# Altium PCB PCB4270Y_A00.PcbDoc (part 3 of 4)
Units mil, origin at the board's own origin, x right, y up, seen from the top; angles counter-clockwise.
Board outline 3622.05 x 2007.87 mil, 4 copper layers (Top Layer, Signal Layer 2, Signal Layer 3, Bottom Layer), stack 62.992 mil thick; 126 components, 105 nets, 457 pads, 1130 vias.
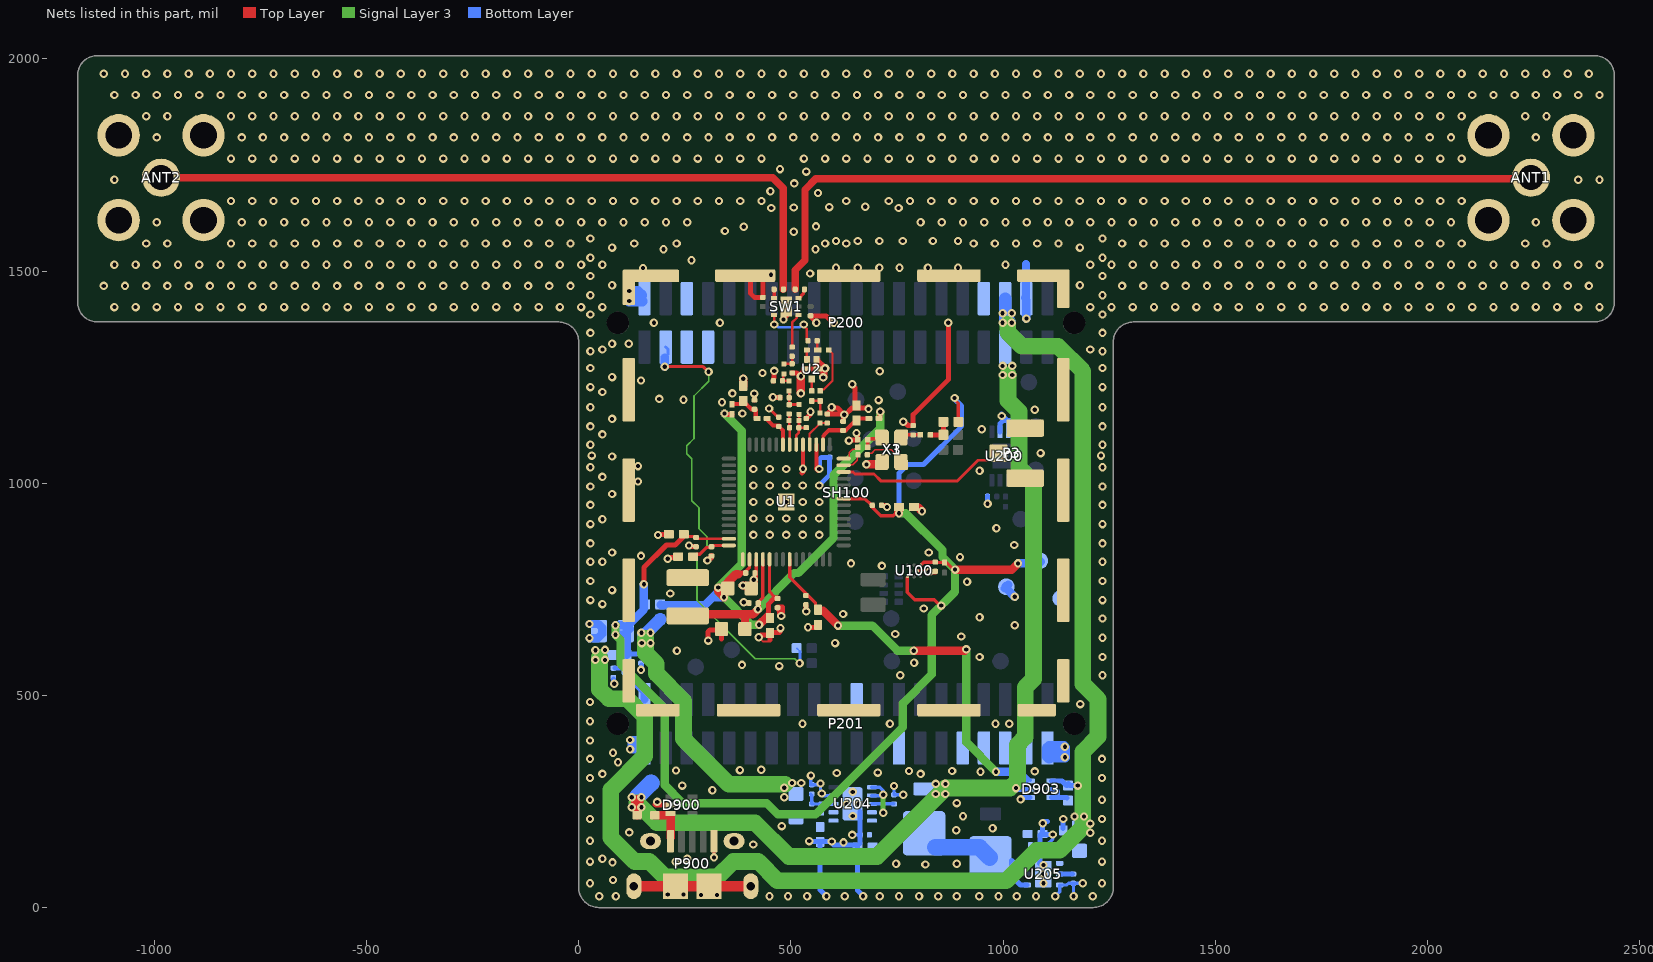
[diagram p5: the nets of this part, all layers, seen from the top]

## Via types
v1: diameter 19.68, hole 9.84, Top Layer to Bottom Layer, tented both sides, 1104 vias
v2: diameter 20, hole 9.84, Top Layer to Bottom Layer, tented both sides, 24 vias
v3: diameter 19.68/0/0/19.68 (per signal layer), hole 9.84, Top Layer to Bottom Layer, tented both sides, 2 vias

## Nets (pads, with @x,y where several pads share a name; then routed paths per layer and width w, separated by ;. In a path a pad name is that pad's centre, name@x,y a point inside that pad or via, vN(x,y) a via of type N, cw(c..) or ccw(c..) an arc to the next point about the centre after c; other vN are vias at no path point) (continued)
GND: ANT1.2 ANT1.3 ANT1.4 ANT1.5 ANT2.2 ANT2.3 ANT2.4 ANT2.5 C10.2 C11.2 C100.2 C102.2 C103.2 C105.2 C106.2 C107.2 C110.2 C111.2 C112.2 C113.2 C114.2 C115.2 C116.2 C117.2 C118.2 C119.2 C120.2 C121.2 C122.2 C123.2 C124.2 C200.2 C201.2 C203.2 C205.2 C207.2 C253.2 C254.2 C255.2 C257.2 C258.2 C259.2 C260.2 C261.2 CF1.2 CF2.2 CF3.2 CM1.2 CR1.2 D900.2 D903.1 P3.2 P3.3 P200.2 P200.38 P201.1 P201.39 P900.5 P900.6 P900.7 P900.8 P900.9 P900.10 P900.11 R6.1 R246.1 SH100.1 SW1.7 TPJ13.1 U1.0 U1.17 U1.19 U1.45 U2.2 U2.3 U2.5 U100.B2 U200.2 U200.3 U200.4 U204.4 U204.11 U205.3 U205.7 X1.2 X3.2 | length 4097.9
  Top Layer w3.94: v1(424.21,636.81) 434.06,626.97 450.79,626.97 ; X3.2@712.6,1044.29 X3.2@713.59,1043.3
  Top Layer w6.89: U100.B2@798.23,793.31 v1@818.9,793.31
  Top Layer w7.09: v1@453.06,1171.74 C107.2@469.57,1155.24
  Top Layer w7.87: v1(318.9,118.11) P900.5@318.9,156.5 ; C110.2@418.31,790.35 U1.45@418.31,820.47 ; C10.2@546.26,1394.69 546.46,1394.49 546.59,1394.35 546.59,1389.48 558.13,1377.95 v1(560.04,1377.95) ; v1@818.9,793.31 v1@819.88,792.32
  Top Layer w8.66: v1@527.97,1033.31 v1(528.54,1033.88)
  Top Layer w9.06: v1(528.54,1033.88) U1.19@528.54,1090.94 ; v1@560.04,1034.45 U1.17@560.04,1090.94
  Top Layer w11.81: v1@181.07,244.11 185.98,249.02 v1(185.04,249.02) ; v1@181.09,244.08 180.12,243.11 182.09,241.14 D900.2@216.54,241.14 ; v1@189.96,878.94 C117.2@213.58,878.94 ; v1@208.66,820.87 212.6,824.8 232.28,824.8 C123.2@234.25,826.77 ; v1@257.87,853.35 260.83,850.39 C116.2@276.57,850.39 ; v1(303.15,817.91) 310.04,824.8 C122.2@312.99,824.8 ; v1@304.13,627.95 304.13,649.61 309.02,654.49 334.61,654.49 C120.2@336.61,656.5 336.61,632.87 ; v1@304.13,816.93 305.12,816.93 C122.2@312.99,824.8 ; C122.2@312.99,829.72 C122.2@312.99,828.74 C122.2@312.99,824.8 ; v1@384.84,719.49 386.81,717.52 C121.2@398.62,717.52 ; SH100.1@392.32,1489.37 396.44,1489.37 405.3,1480.51 405.3,1446.64 413.95,1437.99 C11.2@434.06,1437.99 434.06,1480.51 444.75,1491.2 v1(452.79,1491.2) ; v1@410.45,772.66 411.08,772.66 410.43,773.31 v1@416.34,779.22 ; v1@411.42,1213.58 v1(413.78,1211.22) 414.37,1210.63 C106.2@414.37,1195.87 ; C111.2@412.4,750.98 416.34,754.92 v1@416.34,779.22 ; C110.2@416.34,789.37 v1@416.34,779.22 ; v1@430.12,642.72 444.88,642.72 C113.2@450.79,648.62 ; 450.79,630.91 C113.2@450.79,646.65 C113.2@450.79,648.62 ; v1(457.68,1202.76) 458.17,1202.26 474.21,1202.26 474.41,1202.07 CF1.2@474.41,1201.77 ; CF2.2@458.66,1241.14 458.86,1241.34 458.86,1246.66 460.63,1248.43 v1(460.63,1264.76) ; C112.2@468.12,705.32 473.43,700.01 ; C112.2@468.5,707.68 480.31,707.68 480.31,694.88 v1@477.36,691.93 ; v1@473.43,687.01 473.43,700.01 ; v1@474.41,658.46 474.41,649.61 473.43,648.62 C113.2@450.79,648.62 ; v1@474.41,688.98 v1@477.36,691.93 ; v1(477.36,687.01) v1@477.36,691.93 ; CF3.2@502.95,1259.84 503.15,1259.65 513.81,1259.65 521.49,1251.97 v1(523.62,1251.97) 525.13,1253.48 525.13,1258.99 530.41,1264.27 530.41,1268.7 U2.5@534.84,1268.7 U2.2@562.03,1268.7 ; v1@526.57,1024.61 528.54,1026.57 v1(528.54,1033.88) ; v1@535.43,697.83 C118.2@535.43,711.61 ; CM1.2@536.42,1152.56 546.26,1162.4 v1(546.26,1168.31) ; v1@542.32,660.43 558.07,660.43 C119.2@563.98,666.34 ; C10.2@546.46,1394.49 582.81,1394.49 599.28,1378.02 v1(601.41,1378.02) ; v1@560.04,1034.45 v1@563.98,1030.51 ; U2.3@560.55,1291.85 U2.3@561.06,1291.34 ; C103.2@623.03,1145.67 623.62,1145.67 623.82,1145.87 623.82,1157.12 625.98,1159.29 v1(625.98,1161.42) ; v1(636.81,1100.39) 638.94,1100.39 640.52,1101.97 657.09,1101.97 R6.1@657.48,1102.36 657.09,1102.36 656.69,1102.76 656.69,1113.81 654.53,1115.98 v1(654.53,1118.11) v1@652.4,1118.11 ; v1(644.68,1233.27) 644.68,1231.14 650.59,1225.23 650.59,1187.01 C102.2@654.53,1183.07 654.53,1181.1 650.59,1177.17 643.86,1177.17 628.11,1161.42 v1(625.98,1161.42) ; C102.2@652.56,1177.17 v1@679.13,1177.17 ; C114.2@713.58,947.83 724.41,947.83 v1@728.35,943.9 ; v1@725.49,943.9 v1(726.38,943.9) ; v2(764.76,1144.69) 766.98,1144.69 775.84,1135.83 787.93,1135.83 C100.2@788.12,1135.63 C100.2@788.19,1135.63 ; C100.2@788.71,1135.63 C100.2@788.19,1135.63 ; v1(825.79,791.34) 825.79,791.42 824.84,792.36 824.8,792.32 823.82,791.34 C124.2@840.55,791.34 ; v1(871.06,1377.95) 871.06,1244.09 788.39,1161.42 788.39,1135.83 C100.2@788.19,1135.63 ; 473.43,700.01 477.36,696.08 v1@477.36,691.93 ; U2.3@561.06,1291.34 562.03,1290.37 U2.2@562.03,1268.7 ; U2.3@561.06,1291.34 563.41,1291.34 563.41,1290.1 580.71,1272.8 v1(580.71,1270.67) 578.58,1270.67 576.61,1268.7 U2.2@563.58,1268.7 U2.2@562.03,1268.7 ; v1(625.98,1161.42) 609.82,1177.58 597.56,1177.58 v1(596.05,1179.09) 596.05,1173.81 CR1.2@585.63,1163.39 585.83,1163.19 622.08,1163.19 623.85,1161.42 v1(625.98,1161.42)
  Top Layer w12: v1(482.69,1385.67) 482.69,1387.75 489.17,1394.23 SW1.7@489.17,1416.34
  Top Layer w19.68: v1(386.81,758.86) 392.72,758.86 C111.2@397.64,753.94 ; C105.2@387.8,1228.35 v1(387.8,1246.06) ; v1(523.62,1211.61) v1(523.62,1251.97) ; v1(576.4,1249.38) 576.4,1266.36 v1(580.71,1270.67) ; v2(678.15,1044.29) X3.2@712.6,1044.29 ; C115.2@788.39,943.9 799.21,943.9 v1@808.07,935.04
  Top Layer w25: P900.8@129.92,50.2 P900.10@228.35,50.2 P900.11@307.09,50.2 P900.9@405.51,50.2
  Bottom Layer w7.87: v2@545.28,312.01 547.24,310.04 547.24,289.37 569.88,289.37 569.88,271.65 v1(572.83,268.7) ; v1@572.83,266.73 575.79,263.78 U204.4@600.39,263.78 ; v1@640.75,171.26 C254.2@663.39,171.26 ; v1@742.13,284.45 743.11,283.46 C255.2@743.11,265.75 762.8,265.75 v1@763.78,264.76 ; v1(1041.34,254.92) v1@1045.28,258.86 ; C261.2@1086.61,147.64 1087.6,147.64 1103.35,147.64 1117.13,161.42 v1@1117.13,169.29 ; v1(1123.03,26.57) 1133.46,37.01 U205.3@1133.46,53.15 1150.59,53.15 1154.53,57.09 C259.2@1165.94,57.09 ; v1@1165.35,29.53 1165.94,30.12 C259.2@1165.94,57.09 ; v1@1187.01,56.1 1186.02,57.09 C259.2@1165.94,57.09
  Bottom Layer w11.81: v1@81.69,533.46 C201.2@81.69,538.39 ; C203.2@147.64,571.85 147.64,561.02 v1(146.65,560.04) v1@148.62,558.07 ; v1@548.23,155.51 v1(596.46,155.51) ; v1@566.93,995.08 591.54,1019.69 C207.2@591.54,1061.02 571.85,1061.02 566.93,1056.1 v1@566.93,1034.45 ; C257.2@568.9,154.53 568.9,41.34 v1@582.68,27.56 ; v1@596.46,151.57 600.39,147.64 653.54,147.64 C253.2@657.48,143.7 657.48,40.35 v1@669.29,28.54 ; C253.2@663.39,150.59 C254.2@663.39,171.26 U204.11@663.39,226.38 ; v1(670.28,26.57) v1@670.28,27.56 ; v1(963.58,951.77) C200.2@963.58,969.49 ; U200.2@993.11,1121.06 993.11,1140.75 1000.49,1148.13 1025.1,1148.13 1032.48,1140.75 U200.4@1032.48,1121.06 ; v1@996.56,1162.89 996.56,1160.93 1012.8,1144.69 U200.3@1012.8,1121.06 ; v1@1045.28,258.86 D903.1@1063.98,258.86 ; U205.7@1085.63,103.35 1087.6,105.32 1087.6,147.64 1087.6,171.26 1088.58,172.24 1089.57,171.26 1090.55,172.24 v1(1117.13,172.24) ; C260.2@1093.5,177.17 1093.5,202.76 1104.33,202.76 ; C258.2@1141.73,186.02 v1(1141.73,208.66)
  Bottom Layer w19.68: v1(25.59,634.84) 45.28,634.84 55.12,644.69 55.12,659.45 46.26,668.31 v1(25.59,668.31) ; TPJ13.1@1003.94,751.97 TPJ13.1@1007.87,751.97 ; TPJ13.1@1005.91,756.89 1007.87,754.92 TPJ13.1@1007.87,751.97 ; v1(1027.56,732.28) TPJ13.1@1007.87,751.97 ; P200.38@1052.17,1437.01 1054.13,1438.98 1054.13,1516.73 ; P200.38@1054.13,1432.09 1055.12,1431.1 v1(1055.12,1387.8)
  Bottom Layer w20: TPJ13.1@1007.87,755.91 TPJ13.1@1012.8,760.83
  Bottom Layer w25: v1(119.09,1429.13) 149.47,1429.13 149.54,1429.2 P200.2@149.61,1429.13 ; v1@122.05,1452.76 139.17,1452.76 P200.2@149.02,1442.91 ; P201.39@1104.92,375.98 1138.78,375.98 v1@1142.72,379.92 ; P201.39@1104.92,375.98 1108.86,379.92 v1@1142.72,379.92 ; P201.39@1104.92,375.98 1104.92,355.71 1108.27,352.36 1110.24,354.33 1111.22,353.35 1112.2,354.33 v1(1145.67,354.33) 1145.67,376.97 v1@1142.72,379.92 ; v1@127.95,375 127.95,391.73 154.92,391.73 154.92,375 v1@127.95,375
  other v1: 48.23,26.57 87.6,26.57 449.8,26.57 493.11,26.57 538.39,26.57 583.66,26.57 626.97,26.57 709.65,26.57 754.92,26.57 802.17,26.57 847.44,26.57 890.75,26.57 943.9,26.57 989.17,26.57 1032.48,26.57 1077.76,26.57 1166.34,26.57 1211.61,26.57 288.39,29.53 325.79,29.53 209.65,30.51 247.05,30.51 26.57,57.09 1095.47,57.09 1187.99,57.09 1233.27,57.09 80.71,64.96 1095.47,78.74 1095.47,100.39 816.93,101.38 748.03,103.35 890.75,103.35 79.72,106.3 26.57,108.27 228.35,108.27 1233.27,108.27 55.71,114.96 255.71,114.96 411.42,148.62 624.02,153.54 543.31,156.5 26.57,157.48 1233.27,157.48 644.69,171.26 119.09,177.17 889.76,182.09 975.39,187.01 478.35,191.93 1093.5,198.82 26.57,208.66 1233.27,208.66 905.71,214.96 645.67,215.55 631.89,244.09 659.45,244.09 890.75,246.06 26.57,253.94 1233.27,253.94 764.76,265.75 645.67,272.64 314.96,276.57 743.11,286.42 244.09,287.4 569.88,292.32 26.57,305.12 1233.27,305.12 55.71,314.96 805.71,314.96 608.27,316.93 704.72,317.91 946.85,319.88 1074.8,320.87 778.54,321.85 879.92,321.85 229.33,322.83 379.92,323.82 430.12,324.8 92.52,342.52 26.57,350.39 1233.27,350.39 80.71,364.96 121.06,373.03 1145.67,378.94 26.57,393.7 121.06,394.69 527.56,433.07 733.27,433.07 982.28,433.07 1014.76,433.07 26.57,438.98 1182.09,479.33 26.57,484.25 83.66,527.56 757.87,547.24 1234.25,547.24 472.44,568.9 384.84,571.85 790.35,576.77 944.88,590.55 1234.25,590.55 231.31,605.34 604.33,623.03 305.12,628.94 1234.25,635.83 901.57,638.78 746.06,644.69 475.39,658.46 540.35,660.43 1027.59,665.41 1234.25,681.1 944.88,684.06 623.03,691.93 536.42,697.83 812.99,704.72 55.71,714.96 388.78,719.49 27.56,724.41 1234.25,724.41 215.55,740.16 78.74,748.03 915.35,767.72 27.56,769.69 1234.25,769.69 412.42,772.66 714.57,805.12 641.73,811.02 27.56,814.96 55.71,814.96 1234.25,814.96 209.66,821.89 898.62,825.79 146.65,828.74 78.74,836.61 824.8,836.61 259.84,853.35 1026.57,854.33 27.56,858.27 1234.25,858.27 187.01,877.95 411.57,878.11 450.37,878.11 489.17,878.11 527.97,878.11 566.77,878.11 984.29,893.76 27.56,903.54 1234.25,903.54 55.71,914.96 411.57,916.91 450.37,916.91 489.17,916.91 527.97,916.91 566.77,916.91 809.06,934.06 27.56,948.82 1234.25,948.82 411.57,955.71 450.37,955.71 489.17,955.71 527.97,955.71 566.77,955.71 78.74,974.41 27.56,992.13 1234.25,992.13 411.57,994.51 450.37,994.51 489.17,994.51 527.97,994.51 566.77,994.51 139.76,1003.94 55.71,1014.96 411.57,1033.31 450.37,1033.31 489.17,1033.31 566.77,1033.31 27.56,1037.4 1234.25,1037.4 139.76,1040.35 78.74,1062.99 30.71,1064.96 1230.71,1064.96 1088.58,1070.87 27.56,1090.55 1234.25,1090.55 55.71,1114.96 27.56,1133.86 1234.25,1133.86 78.74,1151.57 997.05,1158.46 385.83,1164.37 1074.8,1173.23 683.07,1175.2 448.82,1176.18 27.56,1179.13 1234.25,1179.13 337.6,1190.94 706.69,1195.87 247.05,1196.85 189.96,1198.82 362.2,1211.61 55.71,1214.96 27.56,1226.38 1234.25,1226.38 146.65,1242.13 78.74,1250 433.07,1259.84 709.65,1263.78 27.56,1271.65 1234.25,1271.65 27.56,1311.02 1234.25,1311.02 55.71,1314.96 1205.71,1314.96 78.78,1328.8 118.11,1328.74 27.56,1354.33 1234.25,1354.33 177.17,1377.95 332.68,1377.95 27.56,1397.64 1234.25,1397.64 -1094.29,1414.96 -1044.29,1414.96 -994.29,1414.96 -944.29,1414.96 -894.29,1414.96 -844.29,1414.96 -794.29,1414.96 -744.29,1414.96 -694.29,1414.96 -644.29,1414.96 -594.29,1414.96 -544.29,1414.96 -494.29,1414.96 -444.29,1414.96 -394.29,1414.96 -344.29,1414.96 -294.29,1414.96 -244.29,1414.96 -194.29,1414.96 -144.29,1414.96 -94.29,1414.96 -44.29,1414.96 5.71,1414.96 55.71,1414.96 1205.71,1414.96 1255.71,1414.96 1305.71,1414.96 1355.71,1414.96 1405.71,1414.96 1455.71,1414.96 1505.71,1414.96 1555.71,1414.96 1605.71,1414.96 1655.71,1414.96 1705.71,1414.96 1755.71,1414.96 1805.71,1414.96 1855.71,1414.96 1905.71,1414.96 1955.71,1414.96 2005.71,1414.96 2055.71,1414.96 2105.71,1414.96 2155.71,1414.96 2205.71,1414.96 2255.71,1414.96 2305.71,1414.96 2355.71,1414.96 2405.71,1414.96 27.56,1442.91 1234.25,1442.91 119.09,1452.76 -1119.29,1464.96 -1069.29,1464.96 -1019.29,1464.96 -969.29,1464.96 -919.29,1464.96 -869.29,1464.96 -819.29,1464.96 -769.29,1464.96 -719.29,1464.96 -669.29,1464.96 -619.29,1464.96 -569.29,1464.96 -519.29,1464.96 -469.29,1464.96 -419.29,1464.96 -369.29,1464.96 -319.29,1464.96 -269.29,1464.96 -219.29,1464.96 -169.29,1464.96 -119.29,1464.96 -69.29,1464.96 -19.29,1464.96 1280.71,1464.96 1330.71,1464.96 1380.71,1464.96 1430.71,1464.96 1480.71,1464.96 1530.71,1464.96 1580.71,1464.96 1630.71,1464.96 1680.71,1464.96 1730.71,1464.96 1780.71,1464.96 1830.71,1464.96 1880.71,1464.96 1930.71,1464.96 1980.71,1464.96 2030.71,1464.96 2080.71,1464.96 2130.71,1464.96 2180.71,1464.96 2230.71,1464.96 2280.71,1464.96 2330.71,1464.96 2380.71,1464.96 78.78,1466.6 1181.14,1466.6 27.56,1488.19 1234.25,1488.19 545.28,1494.09 151.57,1506.89 606.3,1507.87 657.48,1507.87 708.66,1507.87 755.91,1507.87 822.83,1507.87 893.7,1507.87 -1094.29,1514.96 -1044.29,1514.96 -994.29,1514.96 -944.29,1514.96 -894.29,1514.96 -844.29,1514.96 -794.29,1514.96 -744.29,1514.96 -694.29,1514.96 -644.29,1514.96 -594.29,1514.96 -544.29,1514.96 -494.29,1514.96 -444.29,1514.96 -394.29,1514.96 -344.29,1514.96 -294.29,1514.96 -244.29,1514.96 -194.29,1514.96 -144.29,1514.96 -94.29,1514.96 -44.29,1514.96 5.71,1514.96 55.71,1514.96 1005.71,1514.96 1205.71,1514.96 1255.71,1514.96 1305.71,1514.96 1355.71,1514.96 1405.71,1514.96 1455.71,1514.96 1505.71,1514.96 1555.71,1514.96 1605.71,1514.96 1655.71,1514.96 1705.71,1514.96 1755.71,1514.96 1805.71,1514.96 1855.71,1514.96 1905.71,1514.96 1955.71,1514.96 2005.71,1514.96 2055.71,1514.96 2105.71,1514.96 2155.71,1514.96 2205.71,1514.96 2255.71,1514.96 2305.71,1514.96 2355.71,1514.96 2405.71,1514.96 265.75,1525.59 27.56,1531.5 1234.25,1531.5 199.8,1551.18 558.07,1551.18 78.78,1555.18 1181.14,1555.18 -1019.29,1564.96 -969.29,1564.96 -819.29,1564.96 -769.29,1564.96 -719.29,1564.96 -669.29,1564.96 -619.29,1564.96 -569.29,1564.96 -519.29,1564.96 -469.29,1564.96 -419.29,1564.96 -369.29,1564.96 -319.29,1564.96 -269.29,1564.96 -219.29,1564.96 -169.29,1564.96 -119.29,1564.96 -69.29,1564.96 -19.29,1564.96 130.71,1564.96 230.71,1564.96 580.71,1564.96 630.71,1564.96 930.71,1564.96 980.71,1564.96 1030.71,1564.96 1080.71,1564.96 1130.71,1564.96 1280.71,1564.96 1330.71,1564.96 1380.71,1564.96 1430.71,1564.96 1480.71,1564.96 1530.71,1564.96 1580.71,1564.96 1630.71,1564.96 1680.71,1564.96 1730.71,1564.96 1780.71,1564.96 1830.71,1564.96 1880.71,1564.96 1930.71,1564.96 1980.71,1564.96 2030.71,1564.96 2080.71,1564.96 2230.71,1564.96 2280.71,1564.96 606.3,1570.87 657.48,1570.87 708.66,1570.87 763.78,1570.87 834.65,1570.87 893.7,1570.87 27.56,1576.77 1234.25,1576.77 506.89,1592.52 344.49,1594.49 388.78,1604.33 559.06,1605.32 -994.29,1614.96 -794.29,1614.96 -744.29,1614.96 -694.29,1614.96 -644.29,1614.96 -594.29,1614.96 -544.29,1614.96 -494.29,1614.96 -444.29,1614.96 -394.29,1614.96 -344.29,1614.96 -294.29,1614.96 -244.29,1614.96 -194.29,1614.96 -144.29,1614.96 -94.29,1614.96 -44.29,1614.96 5.71,1614.96 55.71,1614.96 105.71,1614.96 155.71,1614.96 205.71,1614.96 255.71,1614.96 805.71,1614.96 855.71,1614.96 905.71,1614.96 955.71,1614.96 1005.71,1614.96 1055.71,1614.96 1105.71,1614.96 1155.71,1614.96 1205.71,1614.96 1255.71,1614.96 1305.71,1614.96 1355.71,1614.96 1405.71,1614.96 1455.71,1614.96 1505.71,1614.96 1555.71,1614.96 1605.71,1614.96 1655.71,1614.96 1705.71,1614.96 1755.71,1614.96 1805.71,1614.96 1855.71,1614.96 1905.71,1614.96 1955.71,1614.96 2005.71,1614.96 2055.71,1614.96 2255.71,1614.96 453.74,1648.62 753.94,1648.62 506.89,1649.61 590.55,1650.59 675.2,1651.57 -819.29,1664.96 -769.29,1664.96 -719.29,1664.96 -669.29,1664.96 -619.29,1664.96 -569.29,1664.96 -519.29,1664.96 -469.29,1664.96 -419.29,1664.96 -369.29,1664.96 -319.29,1664.96 -269.29,1664.96 -219.29,1664.96 -169.29,1664.96 -119.29,1664.96 -69.29,1664.96 -19.29,1664.96 30.71,1664.96 80.71,1664.96 130.71,1664.96 180.71,1664.96 230.71,1664.96 280.71,1664.96 330.71,1664.96 380.71,1664.96 430.71,1664.96 630.71,1664.96 730.71,1664.96 780.71,1664.96 830.71,1664.96 880.71,1664.96 930.71,1664.96 980.71,1664.96 1030.71,1664.96 1080.71,1664.96 1130.71,1664.96 1180.71,1664.96 1230.71,1664.96 1280.71,1664.96 1330.71,1664.96 1380.71,1664.96 1430.71,1664.96 1480.71,1664.96 1530.71,1664.96 1580.71,1664.96 1630.71,1664.96 1680.71,1664.96 1730.71,1664.96 1780.71,1664.96 1830.71,1664.96 1880.71,1664.96 1930.71,1664.96 1980.71,1664.96 2030.71,1664.96 2080.71,1664.96 563.98,1684.06 451.77,1687.99 507.87,1706.69 -1094.29,1714.96 2355.71,1714.96 2405.71,1714.96 536.42,1734.25 474.41,1740.16 -819.29,1764.96 -769.29,1764.96 -719.29,1764.96 -669.29,1764.96 -619.29,1764.96 -569.29,1764.96 -519.29,1764.96 -469.29,1764.96 -419.29,1764.96 -369.29,1764.96 -319.29,1764.96 -269.29,1764.96 -219.29,1764.96 -169.29,1764.96 -119.29,1764.96 -69.29,1764.96 -19.29,1764.96 30.71,1764.96 80.71,1764.96 130.71,1764.96 180.71,1764.96 230.71,1764.96 280.71,1764.96 330.71,1764.96 380.71,1764.96 430.71,1764.96 530.71,1764.96 580.71,1764.96 630.71,1764.96 680.71,1764.96 730.71,1764.96 780.71,1764.96 830.71,1764.96 880.71,1764.96 930.71,1764.96 980.71,1764.96 1030.71,1764.96 1080.71,1764.96 1130.71,1764.96 1180.71,1764.96 1230.71,1764.96 1280.71,1764.96 1330.71,1764.96 1380.71,1764.96 1430.71,1764.96 1480.71,1764.96 1530.71,1764.96 1580.71,1764.96 1630.71,1764.96 1680.71,1764.96 1730.71,1764.96 1780.71,1764.96 1830.71,1764.96 1880.71,1764.96 1930.71,1764.96 1980.71,1764.96 2030.71,1764.96 2080.71,1764.96 -994.29,1814.96 -794.29,1814.96 -744.29,1814.96 -694.29,1814.96 -644.29,1814.96 -594.29,1814.96 -544.29,1814.96 -494.29,1814.96 -444.29,1814.96 -394.29,1814.96 -344.29,1814.96 -294.29,1814.96 -244.29,1814.96 -194.29,1814.96 -144.29,1814.96 -94.29,1814.96 -44.29,1814.96 5.71,1814.96 55.71,1814.96 105.71,1814.96 155.71,1814.96 205.71,1814.96 255.71,1814.96 305.71,1814.96 355.71,1814.96 405.71,1814.96 455.71,1814.96 505.71,1814.96 555.71,1814.96 605.71,1814.96 655.71,1814.96 705.71,1814.96 755.71,1814.96 805.71,1814.96 855.71,1814.96 905.71,1814.96 955.71,1814.96 1005.71,1814.96 1055.71,1814.96 1105.71,1814.96 1155.71,1814.96 1205.71,1814.96 1255.71,1814.96 1305.71,1814.96 1355.71,1814.96 1405.71,1814.96 1455.71,1814.96 1505.71,1814.96 1555.71,1814.96 1605.71,1814.96 1655.71,1814.96 1705.71,1814.96 1755.71,1814.96 1805.71,1814.96 1855.71,1814.96 1905.71,1814.96 1955.71,1814.96 2005.71,1814.96 2055.71,1814.96 2255.71,1814.96 -1019.29,1864.96 -969.29,1864.96 -819.29,1864.96 -769.29,1864.96 -719.29,1864.96 -669.29,1864.96 -619.29,1864.96 -569.29,1864.96 -519.29,1864.96 -469.29,1864.96 -419.29,1864.96 -369.29,1864.96 -319.29,1864.96 -269.29,1864.96 -219.29,1864.96 -169.29,1864.96 -119.29,1864.96 -69.29,1864.96 -19.29,1864.96 30.71,1864.96 80.71,1864.96 130.71,1864.96 180.71,1864.96 230.71,1864.96 280.71,1864.96 330.71,1864.96 380.71,1864.96 430.71,1864.96 480.71,1864.96 530.71,1864.96 580.71,1864.96 630.71,1864.96 680.71,1864.96 730.71,1864.96 780.71,1864.96 830.71,1864.96 880.71,1864.96 930.71,1864.96 980.71,1864.96 1030.71,1864.96 1080.71,1864.96 1130.71,1864.96 1180.71,1864.96 1230.71,1864.96 1280.71,1864.96 1330.71,1864.96 1380.71,1864.96 1430.71,1864.96 1480.71,1864.96 1530.71,1864.96 1580.71,1864.96 1630.71,1864.96 1680.71,1864.96 1730.71,1864.96 1780.71,1864.96 1830.71,1864.96 1880.71,1864.96 1930.71,1864.96 1980.71,1864.96 2030.71,1864.96 2080.71,1864.96 2230.71,1864.96 2280.71,1864.96 -1094.29,1914.96 -1044.29,1914.96 -994.29,1914.96 -944.29,1914.96 -894.29,1914.96 -844.29,1914.96 -794.29,1914.96 -744.29,1914.96 -694.29,1914.96 -644.29,1914.96 -594.29,1914.96 -544.29,1914.96 -494.29,1914.96 -444.29,1914.96 -394.29,1914.96 -344.29,1914.96 -294.29,1914.96 -244.29,1914.96 -194.29,1914.96 -144.29,1914.96 -94.29,1914.96 -44.29,1914.96 5.71,1914.96 55.71,1914.96 105.71,1914.96 155.71,1914.96 205.71,1914.96 255.71,1914.96 305.71,1914.96 355.71,1914.96 405.71,1914.96 455.71,1914.96 505.71,1914.96 555.71,1914.96 605.71,1914.96 655.71,1914.96 705.71,1914.96 755.71,1914.96 805.71,1914.96 855.71,1914.96 905.71,1914.96 955.71,1914.96 1005.71,1914.96 1055.71,1914.96 1105.71,1914.96 1155.71,1914.96 1205.71,1914.96 1255.71,1914.96 1305.71,1914.96 1355.71,1914.96 1405.71,1914.96 1455.71,1914.96 1505.71,1914.96 1555.71,1914.96 1605.71,1914.96 1655.71,1914.96 1705.71,1914.96 1755.71,1914.96 1805.71,1914.96 1855.71,1914.96 1905.71,1914.96 1955.71,1914.96 2005.71,1914.96 2055.71,1914.96 2105.71,1914.96 2155.71,1914.96 2205.71,1914.96 2255.71,1914.96 2305.71,1914.96 2355.71,1914.96 2405.71,1914.96 -1119.29,1964.96 -1069.29,1964.96 -1019.29,1964.96 -969.29,1964.96 -919.29,1964.96 -869.29,1964.96 -819.29,1964.96 -769.29,1964.96 -719.29,1964.96 -669.29,1964.96 -619.29,1964.96 -569.29,1964.96 -519.29,1964.96 -469.29,1964.96 -419.29,1964.96 -369.29,1964.96 -319.29,1964.96 -269.29,1964.96 -219.29,1964.96 -169.29,1964.96 -119.29,1964.96 -69.29,1964.96 -19.29,1964.96 30.71,1964.96 80.71,1964.96 130.71,1964.96 180.71,1964.96 230.71,1964.96 280.71,1964.96 330.71,1964.96 380.71,1964.96 430.71,1964.96 480.71,1964.96 530.71,1964.96 580.71,1964.96 630.71,1964.96 680.71,1964.96 730.71,1964.96 780.71,1964.96 830.71,1964.96 880.71,1964.96 930.71,1964.96 980.71,1964.96 1030.71,1964.96 1080.71,1964.96 1130.71,1964.96 1180.71,1964.96 1230.71,1964.96 1280.71,1964.96 1330.71,1964.96 1380.71,1964.96 1430.71,1964.96 1480.71,1964.96 1530.71,1964.96 1580.71,1964.96 1630.71,1964.96 1680.71,1964.96 1730.71,1964.96 1780.71,1964.96 1830.71,1964.96 1880.71,1964.96 1930.71,1964.96 1980.71,1964.96 2030.71,1964.96 2080.71,1964.96 2130.71,1964.96 2180.71,1964.96 2230.71,1964.96 2280.71,1964.96 2330.71,1964.96 2380.71,1964.96
  other v2: 547.24,311.02 944.88,1029.53 949.8,1126.97
JOYSTICK: P200.3 R217.2 | length 1104
  Top Layer w6.89: v1(202.76,1274.61) 293.31,1274.61 v1@306.1,1261.81
  Signal Layer 3 w3.94: v1(306.1,1262.8) 306.1,1240.16 271.65,1205.71 271.65,1105.32 254.94,1088.6 254.94,1069.32 266.73,1057.52 266.73,958.66 283.46,941.93 283.46,892.72 302.17,874.02 302.17,851.13 278.78,827.74 278.78,724.06 416.22,586.61 508.86,586.61 513.84,581.64 513.84,575.79 519.71,581.66 520.67,580.71 v1(520.67,575.79)
  Bottom Layer w3.94: R217.2@513.78,611.22 R217.2@521.65,603.35
  Bottom Layer w6.89: P200.3@202.77,1296.27 210.79,1304.29 210.79,1314.96 P200.3@204.92,1320.87 ; v1@521.65,574.83 R217.2@521.65,603.35
  Bottom Layer w19.68: v1(202.76,1274.61) P200.3@202.76,1296.26
NetC100_1: C100.1 R7.2 X1.4 X3.4 | length 44.4
  Top Layer w3.94: X3.4@760.83,1114.17 X3.4@761.02,1113.98 ; C100.1@788.12,1113.98 C100.1@788.22,1114.07 ; R7.2@805.02,1114.07 R7.2@805.12,1114.17
  Top Layer w7.87: X3.4@761.02,1113.98 C100.1@788.12,1113.98 ; C100.1@788.22,1114.07 R7.2@805.02,1114.07
NetC101_1: C101.1 X1.3 X3.3 | length 107.2
  Top Layer w3.94: C101.1@680.12,1066.93 684.1,1070.91 690.51,1070.91 698.33,1078.74 737.21,1078.74 750.96,1064.98 750.96,1053.12 X3.3@760.83,1043.3 X3.3@760.83,1043.3
NetC101_2: C101.2 U1.13 | length 50.7
  Top Layer w3.94: U1.13@624.41,1042.32 625.31,1043.23 645.83,1043.23 656.5,1053.89 656.5,1064.96 C101.2@658.46,1066.93
NetC102_1: C102.1 C103.1 L102.2 U1.16 | length 150.5
  Top Layer w7.87: U1.16@575.79,1090.94 575.79,1112.2 583.66,1120.08
  Top Layer w9.84: 577.76,1113.19 589.57,1125 630,1125 652.56,1147.56 C102.1@652.56,1149.61 ; C102.1@657.48,1153.54 658.46,1152.56 L102.2@684.06,1152.56
NetC105_1: C105.1 C106.1 L103.2 L105.1 | length 77.6
  Top Layer w9.84: L103.2@361.22,1187.01 394.68,1187.01 407.48,1174.21 C106.1@414.37,1174.21 ; C106.1@417.32,1172.24 417.32,1154.53 L105.1@418.31,1153.54
NetC107_1: C107.1 L105.2 U1.22 | length 84.9
  Top Layer w8.66: C107.1@472.44,1136.32 472.44,1133.1 481.3,1124.24 U1.22@481.3,1090.94
  Top Layer w9.84: L105.2@442.91,1151.57 458.17,1136.32 C107.1@472.44,1136.32
NetC122_1: C122.1 C123.1 U1.42 | length 91.8
  Top Layer w7.87: C123.1@277.56,829.72 277.56,832.68 285.11,832.68 300.85,848.43 312.99,848.43 317.91,853.35 U1.42@353.94,853.35 U1.42@357.87,853.35
NetC253_1: C253.1 C254.1 C260.1 C261.1 D901.1 D902.1 U204.6 U204.7 U204.9 U204.10 U205.4 U205.6 | length 370.9
  Signal Layer 3 w11.81: v2(717.52,223.43) v2(717.52,265.75) v2@717.52,266.73
  Bottom Layer w7.87: U204.7@690.94,263.78 717.52,263.78 v2(717.52,265.75) 717.52,275.59 709.65,283.46 U204.6@690.94,283.46
  Bottom Layer w11.81: U205.4@1056.69,53.15 1040.94,53.15 1020.28,73.82 1020.28,111.22 1027.17,104.33 U205.6@1056.69,104.33
  Bottom Layer w39.37: D901.1@840.55,141.73 944.88,141.73 D902.1@968.5,118.11
NetC255_1: C255.1 U204.8 | length 52.3
  Bottom Layer w7.87: U204.8@690.94,244.09 691.1,244.25 742.95,244.25 C255.1@743.11,244.09
NetC256_1: C256.1 C257.1 R245.2 R247.1 U204.1 U204.2
NetC256_2: C256.2 R245.1 R246.2 U204.3 | length 74.1
  Bottom Layer w7.87: R246.2@547.24,266.73 549.21,264.76 549.21,246.06 R245.1@548.23,245.08 ; R245.1@549.21,244.09 C256.2@571.85,244.09 U204.3@600.39,244.09
NetC258_1: C258.1 R248.1 U205.1
NetC259_1: C259.1 U205.2 | length 30.5
  Bottom Layer w11.81: U205.2@1133.46,78.74 C259.1@1163.98,78.74
NetCC1_1: CC1.1 CF3.1 LF2.2 | length 37.4
  Top Layer w6: LF2.2@483.27,1281.5 CF3.1@502.95,1281.5 CC1.1@502.95,1299.21
NetCC1_2: CC1.2 SW1.4 | length 83.1
  Top Layer w6: CC1.2@502.95,1320.87 502.95,1378.87 513.83,1389.74 513.83,1394.73 515.75,1396.65 SW1.4@517.72,1396.65
NetCC2_1: CC2.1 R2.2 R4.2 | length 21.9
  Top Layer w6: R2.2@561.52,1313.98 561.76,1314.22 561.76,1335.38 CC2.1@562.01,1335.63
NetCC2_2: CC2.2 SW1.3 | length 140.7
  Top Layer w6: v1(460.63,1374.02) SW1.3@460.63,1396.65 ; v1(530.51,1374.02) 530.51,1370.31 537.36,1363.47 537.36,1338.63 CC2.2@540.35,1335.63
  Bottom Layer w6: v1(460.63,1374.02) 464.33,1374.02 471.18,1367.17 519.97,1367.17 526.81,1374.02 v1(530.51,1374.02)
NetCC3_1: CC3.1 SW1.1 | length 20.7
  Top Layer w7.87: SW1.1@460.63,1436.02 CC3.1@460.63,1456.69
NetCC3_2: ANT2.1 CC3.2 | length 1715.3
  Top Layer w17.32: ANT2.1@-984.25,1720 457.47,1720 482.28,1695.18 CC3.2@482.28,1456.69
NetCC4_1: CC4.1 SW1.6 | length 27.7
  Top Layer w7.87: SW1.6@517.72,1436.02 519.68,1436.02 529.72,1446.06 529.72,1454.53 CC4.1@531.89,1456.69
NetCC4_2: ANT1.1 CC4.2 | length 1967.1
  Top Layer w12: CC4.2@510.24,1456.69 CC4.2@510.34,1456.8
  Top Layer w17.32: CC4.2@510.34,1456.8 510.34,1502.46 533.46,1525.59 533.46,1691.91 558.83,1717.28 2241.37,1717.28 ANT1.1@2244.09,1720
NetCF1_1: CF1.1 CM2.2 LF1.1 LM2.2 | length 56.5
  Top Layer w6: LF1.1@496.06,1217.52 CF1.1@496.06,1201.77 CM2.2@496.06,1185.04 496.56,1185.53 519.19,1185.53 LM2.2@519.68,1186.02
NetCF2_1: CF2.1 LF1.2 LF2.1 | length 33.7
  Top Layer w6: LF2.1@483.27,1257.87 481.79,1256.4 481.79,1242.62 CF2.1@480.31,1241.14 LF1.2@496.06,1241.14
NetCM1_1: CM1.1 CP1.2 LM1.2 LM2.1 U1.20 | length 92
  Top Layer w6: U1.20@512.8,1090.94 512.8,1113.19 518.7,1119.09 CP1.2@518.7,1130.91 ; LM2.1@519.68,1162.4 LM1.2@519.68,1147.64 519.19,1147.15 519.19,1131.4 CP1.2@518.7,1130.91 ; CM1.1@536.42,1130.91 CP1.2@518.7,1130.91
NetCM2_1: CM2.1 CP1.1 LM1.1 U1.21 | length 72.8
  Top Layer w6: CM2.1@496.06,1163.39 LM1.1@496.06,1147.64 496.56,1147.15 496.56,1131.4 CP1.1@497.05,1130.91 U1.21@497.05,1090.94
NetCR1_1: CR1.1 LR1.1 U1.18 | length 77.7
  Top Layer w4.92: U1.18@544.29,1090.94 544.29,1117.13 LR1.1@568.9,1141.73 CR1.1@585.63,1141.73
NetD900_3: D900.3 L901.1 P900.1 | length 86.6
  Top Layer w19.68: L901.1@179.13,217.52 D900.3@212.6,217.52 ; P900.1@216.54,165.16 216.54,215.55 D900.3@218.5,217.52
NetD903_5: D903.5 D903.6 R243.2 | length 65.4
  Bottom Layer w11.81: D903.5@1113.19,278.54 1124.01,278.54 1128.93,273.62 ; D903.6@1114.17,258.86 1149.61,258.86 R243.2@1150.59,257.87 ; 1128.94,262.8 1128.94,273.62
NetL101_1: L101.1 U1.43
NetLR1_2: LR1.2 R1.1 R3.2 | length 48.2
  Top Layer w6: R1.1@549.21,1193.9 R3.2@568.9,1193.9 LR1.2@568.9,1165.35
NetP3_1: P3.1 U1.12 | length 400.5
  Top Layer w6.89: U1.12@624.41,1026.57 646.65,1026.57 651.67,1021.56 695.67,1021.56 711.58,1005.64 892.45,1005.64 940.94,1054.13 972.44,1054.13 P3.1@989.17,1070.87
NetR1_2: R1.2 U2.1 | length 28
  Top Layer w6: R1.2@549.21,1217.52 U2.1@549.21,1245.55
NetR2_1: R2.1 U2.4 | length 22.1
  Top Layer w6: U2.4@537.87,1291.85 R2.1@537.89,1313.98
NetR3_1: R3.1 R4.1 | length 115.7
  Top Layer w5: R3.1@568.9,1217.52 571.85,1220.47 576.77,1220.47 598.43,1242.13 598.43,1305.02 589.47,1313.98 R4.1@589.07,1313.98
NetR5_1: R5.1 R6.2 X1.1 X3.1 | length 55.1
  Top Layer w3.94: R6.2@681.1,1102.36 R6.2@683.31,1104.57 ; X3.1@703.99,1104.57 X3.1@713.59,1114.17
  Top Layer w7.87: R5.1@681.1,1084.65 R6.2@681.1,1102.36 ; R6.2@683.31,1104.57 X3.1@703.99,1104.57
NetR5_2: R5.2 U1.14 | length 51.1
  Top Layer w3.94: U1.14@624.41,1058.07 635.73,1058.07 637.91,1060.25 637.91,1072.28 645.95,1080.32 653.15,1080.32 R5.2@657.48,1084.65
TCXO_supply: R7.1 R10.1 R12.1 | length 61
  Top Layer w11.81: R7.1@828.74,1114.17 R10.1@859.26,1114.17 R12.1@859.26,1144.69
USB_VBUS: D901.2 D903.2 L901.2 P200.35 TPJ20.1 | length 2152.7
  Top Layer w19.68: 136.81,251.97 137.8,250.98 137.8,250 L901.2@137.8,217.52
  Signal Layer 3 w39.37: 136.81,247.05 184.06,199.8 415.35,199.8 495.08,120.08 702.76,120.08 864.17,281.5 1016.73,281.5 1033.96,298.72 1033.96,383.37 1052.17,401.57 1052.17,518.7 1071.85,538.39 1071.85,1002.95 1037.4,1037.4 1037.4,1169.29 1011.81,1194.88 1011.81,1255.91
  Bottom Layer w11.81: v1(1030.51,281.5) 1031.5,280.51 1029.53,278.54 D903.2@1063.98,278.54
  Bottom Layer w39.37: 137.8,249.02 137.8,260.83 TPJ20.1@170.28,293.31
  other v1: 125,236.22 147.64,236.22 125,259.84 147.64,259.84 841.54,267.72 864.17,267.72 841.54,291.34 864.17,291.34 999.02,1254.92 1021.65,1254.92 999.02,1276.57 1021.65,1276.57
USB_VREG: D903.4 P200.36 R202.2 R243.1 R248.2 | length 3231.2
  Signal Layer 3 w39.37: 49.21,589.57 49.21,513.78 70.87,492.13 114.17,492.13 155.51,450.79 155.51,357.28 75.79,277.56 75.79,164.37 131.89,108.27 166.34,108.27 201.77,72.83 328.74,72.83 364.17,108.27 423.23,108.27 468.5,62.99 1006.89,62.99 1078.74,134.84 1132.87,134.84 1187.99,189.96 1187.99,250.98 ; 1010.85,1375.1 1010.79,1356.42 1044.01,1322.98 1129.71,1322.69 1187.99,1264.02 1187.99,526.57 1223.66,490.91 1223.66,402.8 1187.99,367.13 1187.99,251.97
  Bottom Layer w11.81: D903.4@1114.17,298.23 1138.78,298.23 R243.1@1149.61,287.4 ; R243.1@1151.57,287.4 1154.53,290.35 1157.48,287.4 v1(1176.18,287.4) ; R243.1@1154.04,291.83 R243.1@1155.02,290.85
  Bottom Layer w29.53: v1@1004.92,1381.89 v1@1014.76,1381.89 ; v1@1004.92,1382.69 P200.36@1004.92,1435.04
  other v1: 1205.71,176.18 1205.71,197.83 1168.31,214.57 1190.94,214.57 39.37,583.66 62.01,583.66 39.37,606.3 62.01,607.28 999.02,1377.95 1020.67,1377.95 999.02,1400.59 1020.67,1400.59
V_IOVDD2: C118.1 C119.1 D903.3 U1.50 | length 934.5
  Top Layer w7.87: U1.50@497.05,820.47 497.05,778.54 558.07,717.52 C119.1@558.07,704.72
  Top Layer w19.68: C119.1@567.91,699.8 575.79,699.8 v1(611.22,664.37) ; v1(789.41,605.34) 910.46,605.34 v1(913.39,608.27)
  Signal Layer 3 w19.68: v1(611.22,664.37) 691.93,664.37 750.95,605.34 v1(789.41,605.34) ; v1(913.39,608.27) 913.39,389.76 v1(983.27,319.88)
  Bottom Layer w7.87: 1056.1,308.07 1063.98,300.2 D903.3@1063.98,299.21
  Bottom Layer w19.68: v1(983.27,319.88) 1036.42,319.88 D903.3@1054.13,302.17
VDCDC: C120.1 C121.1 L101.2 L102.1 U1.46 | length 912
  Top Layer w7.87: 428.35,724.61 424.21,720.47 434.06,730.31 U1.46@434.06,820.47
  Top Layer w11.81: v1(422.24,702.76) 423.23,703.74 C121.1@423.23,717.52 ; L102.1@706.69,1152.56 709.65,1155.51 709.65,1171.26 706.69,1168.31 v2(710.63,1168.31)
  Top Layer w19.68: L101.2@301.18,690.94 407.48,690.94 ; C120.1@391.73,656.5 391.73,686.02 393.7,687.99 ; 397.64,690.94 410.43,690.94 v1(422.24,702.76)
  Signal Layer 3 w19.68: v1(422.24,702.76) 507.87,788.39 517.72,788.39 600.39,871.06 600.39,1018.7 710.63,1128.94 v2(710.63,1168.31)
VDD: C110.1 C111.1 C112.1 C113.1 L103.1 R210.2 R211.2 U1.44 U1.47 | length 1140.2
  Top Layer w7.87: C110.1@390.75,788.39 390.75,790.35 402.56,802.17 U1.44@402.56,820.47 ; U1.47@449.8,819.29 449.8,744.09 461.12,732.78 ; U1.47@449.8,820.47 U1.47@449.8,821.06
  Top Layer w11.81: v1(343.5,1164.37) 345.47,1162.4 L103.1@361.22,1162.4 ; 375.98,785.43 378.94,788.39 C110.1@390.75,788.39 ; C113.1@446.85,691.93 446.85,715.06 461.13,729.33 C112.1@468.5,729.33
  Top Layer w19.68: v1(328.74,753.94) 328.74,745.08 v1@341.04,732.78 ; C111.1@336.61,751.97 370.08,785.43 375.98,785.43 ; v1(342.52,731.3) 342.52,749.02 C111.1@344.49,750.98 ; v1(425.22,666.37) 443.89,685.04 C113.1@446.85,685.04
  Signal Layer 3 w19.68: v1@336.61,737.2 v1(342.52,731.3) 407.48,666.34 v1(425.22,666.37) ; v1@341.54,732.28 328.74,745.08 v1(328.74,753.94) 383.86,809.06 383.86,1124.02 v1(343.5,1164.37)
  Bottom Layer w19.68: R210.2@192.91,713.58 193.9,712.6 297.24,712.6 328.74,744.09 ; 316.93,731.3 317.91,732.28 318.9,731.3 v1@337.6,731.3 ; v1(328.74,753.94) 328.74,744.09 ; v1(342.52,731.3) v1@337.6,731.3 ; 328.74,744.09 328.74,740.16 v1@337.6,731.3
VLDO_3V6: R211.1 R247.2 | length 612.3
  Signal Layer 3 w39.37: 157.48,634.84 157.48,599.41 183.07,573.82 183.07,551.18 247.05,487.2 247.05,397.64 354.33,290.35 v1@486.22,290.35
  Bottom Layer w29.53: v1@152.56,641.73 v1@152.56,642.72 ; 158.46,639.76 158.46,645.92 191.68,679.13 R211.1@191.93,679.13
  other v1: 484.25,259.84 484.25,282.48 502.95,293.31 524.61,293.31 148.62,623.03 169.29,623.03 147.64,647.64 169.29,647.64
VMCU: C114.1 C115.1 C116.1 C117.1 C124.1 C203.1 C205.1 R12.2 R103.2 R201.1 R202.1 R210.1 TPJ11.1 U1.8 U1.41 U100.A1 U100.E3 | length 3301.1
  Top Layer w6.89: C117.1@241.14,875.98 C117.1@246.06,875.98 ; C116.1@275.59,873.03 274.22,873.03 273.24,874.02 253.94,874.02 C117.1@251.97,875.98 ; C116.1@277.56,873.03 281.5,869.09 U1.41@353.94,869.09 ; C117.1@246.06,875.98 247.05,875.98 C117.1@251.97,875.98 ; C117.1@246.06,875.98 247.05,876.97 249.02,878.94 C117.1@251.97,875.98
  Top Layer w7.87: U1.8@624.41,963.58 674.21,963.58 C114.1@688.98,948.82 ; C114.1@691.93,947.83 691.93,942.91 711.61,923.23 741.14,923.23 749.02,931.1 C115.1@751.97,934.06 ; U100.E3@774.61,778.54 774.61,743.11 792.32,725.39 837.6,725.39 v1@846.46,716.54 ; U100.A1@807.09,808.07 812.99,813.98 815.63,813.98 815.94,813.98 ; C124.1@839.57,812.99 838.58,813.98 832.14,813.98 827.37,813.98 ; C124.1@841.54,812.99 R103.2@860.24,812.99 ; R103.2@861.22,812.99 863.19,814.96 866.14,812.01 867.13,812.99 883.82,796.3 v2(886.85,796.3) ; v1(885.83,1200.79) 885.83,1197.59 894.69,1188.73 R12.2@894.69,1144.69 ; 815.94,813.98 827.37,813.98 ; 815.94,813.98 827.37,813.98
  Top Layer w11.81: v1(153.54,761.81) 153.54,801.18 206.69,854.33 227.36,854.33 247.05,874.02 247.05,875.98 247.05,876.97 C117.1@247.05,878.94 ; v1@749.02,929.13 749.02,931.1 C115.1@749.02,934.52 ; C115.1@750.98,937.99 749.02,936.02 C115.1@749.02,934.52 ; C115.1@755.91,942.91 755.91,941.41 754.92,940.43 C115.1@749.02,934.52
  Top Layer w19.68: v1(754.92,929.13) C115.1@754.92,940.43 ; v2(886.85,796.3) 1020.63,796.3 1020.67,796.26 v1(1035.43,811.02)
  Signal Layer 3 w19.68: v1@87.57,665.35 v1(86.61,665.35) v1(86.61,642.72) 98.43,630.91 98.43,573.82 202.76,469.49 202.76,288.39 245.08,246.06 442.91,246.06 469.49,219.49 558.07,219.49 763.78,425.2 763.78,481.3 831.69,549.21 831.69,688.98 886.85,744.14 v2(886.85,796.3) ; v1(754.92,929.13) 770.67,929.13 857.28,842.52 857.28,825.79 v2(886.85,796.3)
  Bottom Layer w11.81: R202.1@114.17,599.41 116.14,597.44 C203.1@140.75,597.44 ; v1(754.92,929.13) 754.92,1023.62 775.59,1044.29 812.5,1044.29 902.56,1134.35 902.56,1181.92 885.83,1198.66 v1(885.83,1200.79)
  Bottom Layer w19.68: v1(86.61,642.72) 111.22,642.72 C205.1@112.2,641.73 ; v1(86.61,665.35) C205.1@101.38,665.35 ; C205.1@111.22,660.43 153.54,702.76 v1(153.54,761.81) ; C205.1@112.2,648.62 113.19,647.64 R202.1@113.19,595.48 ; C205.1@113.19,649.61 C205.1@120.08,656.5
  Bottom Layer w20: v1(1035.43,811.02) 1070.86,811.02 1077.75,817.91 TPJ11.1@1082.68,812.99 ; TPJ11.1@1086.61,816.93 TPJ11.1@1084.64,814.96 ; TPJ11.1@1088.58,814.96 1086.61,812.99 TPJ11.1@1084.64,814.96 ; TPJ11.1@1082.68,812.99 TPJ11.1@1084.64,814.96 ; TPJ11.1@1082.68,812.99 TPJ11.1@1084.64,814.96
  other v1: 854.33,711.61
VMCU_IN: C201.1 P201.2 R201.2 | length 117.3
  Bottom Layer w11.81: C201.1@85.63,563.98 R201.2@115.16,563.98 ; R201.2@111.22,560.04 R201.2@115.16,563.98 ; R201.2@111.22,563.98 R201.2@115.16,563.98
  Bottom Layer w19.68: R201.2@113.19,551.18 154.92,509.45 P201.2@154.92,490.16
VRF: TPJ9.1
WSTK_F21: P200.34
WSTK_P19: P201.22
WSTK_P22: P201.25
WSTK_P28: P201.31
WSTK_P30: P201.33
WSTK_P32: P201.35
WSTK_P34: P201.37
WSTK_P38: P200.5
WSTK_P39: P200.6
WSTK_P40: P200.7
pads on no net: D900.1 P200.M1 P200.M2 P201.40 P201.M1 P201.M2 P900.4 RP200.3 RP200.6 U100.C1 U200.9 U204. U204.5 U205. U205.5

## Polygon pours and split planes (outlines as drawn)
GND on Bottom Layer "GND_L4" (solid, remove dead copper, pour order 54): -1181.1,0 -1181.1,2007.87 2440.94,2007.87 2440.94,0
GND on Signal Layer 3 "GND_L3" (solid, remove dead copper, pour order 52): -1181.1,0 -1181.1,2007.87 2440.94,2007.87 2440.94,0
GND on Signal Layer 2 "GND_L2" (solid, remove dead copper, pour order 48): -1181.1,0 -1181.1,2007.87 2440.94,2007.87 2440.94,0
GND on Top Layer "GND_L1" (solid, remove dead copper, pour order 56): -1181.1,0 -1181.1,2007.87 2440.94,2007.87 2440.94,0

## Other copper
Top Layer:
  pour cut-out: 507.03,1251.32 ccw(c523.33,1251.32) 523.33,1235.02 ccw(c523.33,1251.32) 539.63,1251.32 ccw(c523.33,1251.32) 523.33,1267.62 ccw(c523.33,1251.32)
  pour cut-out: -1049,1718 ccw(c-985.52,1718) -985.52,1654.52 ccw(c-986.82,1719.31) -922.03,1720.62 ccw(c-984.2,1720.62) -984.21,1782.79 ccw(c-984.21,1718)
  pour cut-out: 289.8,600.39 ccw(c306.1,600.39) 306.1,584.09 ccw(c306.1,600.39) 322.4,600.39 ccw(c306.1,600.39) 306.1,616.69 ccw(c306.1,600.39)
  pour cut-out: 313.42,575.79 ccw(c329.72,575.79) 329.72,559.49 ccw(c329.72,575.79) 346.02,575.79 ccw(c329.72,575.79) 329.72,592.09 ccw(c329.72,575.79)
  pour cut-out: 441.05,1202.46 ccw(c457.35,1202.46) 457.35,1186.16 ccw(c457.35,1202.46) 473.64,1202.46 ccw(c457.35,1202.46) 457.35,1218.76 ccw(c457.35,1202.46)
  pour cut-out: 397.48,1211.22 ccw(c413.78,1211.22) 413.78,1194.92 ccw(c413.78,1211.22) 430.08,1211.22 ccw(c413.78,1211.22) 413.78,1227.52 ccw(c413.78,1211.22)
  pour cut-out: 371.5,1246.06 ccw(c387.8,1246.06) 387.8,1229.76 ccw(c387.8,1246.06) 404.1,1246.06 ccw(c387.8,1246.06) 387.8,1262.36 ccw(c387.8,1246.06)
  pour cut-out: 666.77,1175.63 ccw(c683.07,1175.63) 683.07,1159.33 ccw(c683.07,1175.63) 699.37,1175.63 ccw(c683.07,1175.63) 683.07,1191.93 ccw(c683.07,1175.63)
  pour cut-out: 609.92,1159.48 ccw(c626.22,1159.48) 626.22,1143.18 ccw(c626.22,1159.48) 642.52,1159.48 ccw(c626.22,1159.48) 626.22,1175.78 ccw(c626.22,1159.48)
  pour cut-out: 579.46,1179.42 ccw(c595.76,1179.42) 595.76,1163.12 ccw(c595.76,1179.42) 612.06,1179.42 ccw(c595.76,1179.42) 595.76,1195.72 ccw(c595.76,1179.42)
  pour cut-out: 2180,1718 ccw(c2243.48,1718) 2243.48,1654.52 ccw(c2242.18,1719.31) 2306.97,1720.62 ccw(c2244.8,1720.62) 2244.79,1782.79 ccw(c2244.79,1718)
  pour cut-out: 444.29,1264.39 ccw(c460.59,1264.39) 460.59,1248.09 ccw(c460.59,1264.39) 476.89,1264.39 ccw(c460.59,1264.39) 460.59,1280.69 ccw(c460.59,1264.39)
  pour cut-out: 432.23,1176.61 ccw(c448.53,1176.61) 448.53,1160.31 ccw(c448.53,1176.61) 464.83,1176.61 ccw(c448.53,1176.61) 448.53,1192.91 ccw(c448.53,1176.61)
  pour cut-out: 606.3,1300.2 446.85,1300.2 446.85,1059.06 606.3,1059.06
  pour cut-out: 693.9,1028.05 693.9,1075.79 693.9,1121.06 702.76,1129.92 781.5,1129.92 781.5,1028.54 777.56,1024.61 697.35,1024.61
  region net NetL101_1: 267.22,757.87 267.22,797.24 306.59,797.24 345.96,836.61 386.81,836.61 386.81,804.13 351.38,804.13 305.12,757.87
  region net USB_VBUS: 151.58,269.69 121.06,269.69 115.16,263.78 115.16,232.28 126.97,220.47 145.67,220.47 157.48,232.28 157.48,263.78
  region net EFR32_PD07: 296.26,601.38 296.26,581.69 324.8,610.24 305.12,610.24
  region net EFR32_PD06: 339.57,574.8 339.57,594.49 311.02,565.94 330.71,565.94
Signal Layer 2:
  pour cut-out: -1049,1718 ccw(c-985.52,1718) -985.52,1654.52 ccw(c-986.82,1719.31) -922.03,1720.62 ccw(c-984.2,1720.62) -984.21,1782.79 ccw(c-984.21,1718)
  pour cut-out: 2180,1718 ccw(c2243.48,1718) 2243.48,1654.52 ccw(c2242.18,1719.31) 2306.97,1720.62 ccw(c2244.8,1720.62) 2244.79,1782.79 ccw(c2244.79,1718)
  pour cut-out: 289.8,600.39 ccw(c306.1,600.39) 306.1,584.09 ccw(c306.1,600.39) 322.4,600.39 ccw(c306.1,600.39) 306.1,616.69 ccw(c306.1,600.39)
  pour cut-out: 313.42,575.79 ccw(c329.72,575.79) 329.72,559.49 ccw(c329.72,575.79) 346.02,575.79 ccw(c329.72,575.79) 329.72,592.09 ccw(c329.72,575.79)
Signal Layer 3:
  pour cut-out: -1049,1718 ccw(c-985.52,1718) -985.52,1654.52 ccw(c-986.82,1719.31) -922.03,1720.62 ccw(c-984.2,1720.62) -984.21,1782.79 ccw(c-984.21,1718)
  pour cut-out: 2180,1718 ccw(c2243.48,1718) 2243.48,1654.52 ccw(c2242.18,1719.31) 2306.97,1720.62 ccw(c2244.8,1720.62) 2244.79,1782.79 ccw(c2244.79,1718)
  pour cut-out: 289.8,600.39 ccw(c306.1,600.39) 306.1,584.09 ccw(c306.1,600.39) 322.4,600.39 ccw(c306.1,600.39) 306.1,616.69 ccw(c306.1,600.39)
  pour cut-out: 313.42,575.79 ccw(c329.72,575.79) 329.72,559.49 ccw(c329.72,575.79) 346.02,575.79 ccw(c329.72,575.79) 329.72,592.09 ccw(c329.72,575.79)
  region net VLDO_3V6: 526.57,280.51 496.06,250 480.31,250 474.41,255.91 474.41,300.2 484.25,310.04 521.65,310.04 534.45,297.24 534.45,288.39
  region net USB_VREG: 1158.46,218.5 1164.37,224.41 1195.86,224.41 1215.55,204.73 1215.55,178.15 1203.74,166.34 1172.24,166.34 1158.46,180.12
  region net 5V: 1029.53,242.13 999.02,242.13 993.11,236.22 993.11,204.72 999.02,198.82 1029.53,198.82 1035.43,204.72 1035.43,236.22
  region net USB_VBUS: 151.58,269.69 121.06,269.69 115.16,263.78 115.16,232.28 121.06,226.38 151.57,226.38 157.48,232.28 157.48,263.78
  region net USB_VBUS: 875.98,301.18 837.6,301.18 831.69,295.28 831.69,263.78 837.6,257.87 868.11,257.87 880.91,270.67 880.91,296.26
  region net USB_VREG: 29.53,610.73 29.53,580.22 39.37,570.37 62.99,570.37 72.83,580.22 72.84,610.73 66.93,616.63 35.43,616.63
  region net VLDO_3V6: 177.17,616.14 177.17,653.54 173.23,657.48 146.65,657.48 137.8,648.62 137.8,619.34 144.68,612.45 173.47,612.45
  region net USB_VREG: 988.19,1407.48 994.09,1413.39 1024.61,1413.39 1030.51,1407.48 1030.51,1373.03 1024.61,1367.13 995.08,1367.13 988.19,1374.02
  region net USB_VBUS: 1025.59,1287.4 1031.5,1281.5 1031.5,1248.03 1018.7,1235.24 1004.92,1235.24 989.17,1250.98 989.17,1281.5 995.08,1287.4
  region net 5V: 1098.43,1234.25 1103.35,1229.33 1103.35,1194.88 1101.38,1192.91 1065.94,1192.91 1061.02,1197.83 1061.02,1228.35 1066.93,1234.25
Bottom Layer:
  rectangle net GND: 622.05,190.94 669.29,295.28
  rectangle net GND: 1075.79,30.51 1115.16,125
  pour cut-out: -1049,1718 ccw(c-985.52,1718) -985.52,1654.52 ccw(c-986.82,1719.31) -922.03,1720.62 ccw(c-984.2,1720.62) -984.21,1782.79 ccw(c-984.21,1718)
  pour cut-out: 2180,1718 ccw(c2243.48,1718) 2243.48,1654.52 ccw(c2242.18,1719.31) 2306.97,1720.62 ccw(c2244.8,1720.62) 2244.79,1782.79 ccw(c2244.79,1718)
  pour cut-out: 289.8,600.39 ccw(c306.1,600.39) 306.1,584.09 ccw(c306.1,600.39) 322.4,600.39 ccw(c306.1,600.39) 306.1,616.69 ccw(c306.1,600.39)
  pour cut-out: 313.42,575.79 ccw(c329.72,575.79) 329.72,559.49 ccw(c329.72,575.79) 346.02,575.79 ccw(c329.72,575.79) 329.72,592.09 ccw(c329.72,575.79)
  pour cut-out: 729.33,790.35 729.33,707.68 744.09,707.68 744.09,790.35
  region net NetC258_1: 1195.87,149.61 1195.87,98.43 1124.61,98.43 1124.61,145.67 1128.54,149.61
  region net NetC253_1: 1012.8,165.35 1030.51,183.07 1069.88,183.07 1069.88,136.81 1064.96,131.89 1064.96,98.43 1012.8,98.43
  region net NetC256_1: 494.09,197.84 494.1,224.41 499.02,229.33 612.2,229.33 612.2,182.09 608.27,178.15 513.78,178.15
  region net NetC253_1: 781.5,123.03 679.13,123.03 679.13,229.33 769.68,229.33 781.5,217.52
  pour cut-out: 167.32,332.68 167.32,343.5 522.64,343.5 522.64,332.68
  pour cut-out: 713.58,343.5 713.58,332.68 538.39,332.68 538.39,343.5
  pour cut-out: 963.58,411.42 963.58,422.24 1056.1,422.24 1056.1,411.42
  pour cut-out: 1001.97,443.9 1001.97,454.72 1059.06,454.72 1059.06,443.9
  pour cut-out: 425.2,526.08 425.2,536.91 492.13,536.91 492.13,526.08
  region net VLDO_3V6: 528.54,253.94 524.61,250 480.31,250 474.41,255.91 474.41,286.42 491.14,303.15 528.54,303.15 534.45,297.24 534.45,288.39 528.54,282.48
  region net USB_VREG: 1162.4,222.44 1164.37,224.41 1195.86,224.41 1215.55,204.73 1215.55,178.15 1210.14,172.74 1165.85,172.74 1162.4,176.18
  region net 5V: 1029.53,242.13 999.02,242.13 993.11,236.22 993.11,204.72 999.02,198.82 1029.53,198.82 1035.43,204.72 1035.43,236.22
  region net USB_VBUS: 151.58,269.69 121.06,269.69 115.16,263.78 115.16,232.28 121.06,226.38 151.57,226.38 157.48,232.28 157.48,263.78
  region net USB_VBUS: 868.11,301.18 837.6,301.18 827.76,291.34 827.76,267.72 837.6,257.87 868.11,257.87 874.02,263.78 874.02,295.28
  region net USB_VREG: 35.43,573.82 65.94,573.82 75.79,583.66 75.79,607.28 65.94,617.13 35.43,617.13 29.53,611.22 29.53,579.72
  region net VLDO_3V6: 176.18,615.16 176.18,653.3 172,657.48 146.65,657.48 137.8,648.62 137.8,619.34 144.68,612.45 173.47,612.45
  pour cut-out: 359.25,1470.47 359.25,1481.3 556.1,1481.3 556.1,1470.47
  pour cut-out: 208.24,1274.61 208.24,1285.43 300.2,1285.43 300.2,1274.61
  pour cut-out: 550.76,1356.3 550.76,1367.13 642.72,1367.13 642.72,1356.3
  pour cut-out: 558.07,1388.78 558.07,1399.61 620.08,1399.61 620.08,1388.78
  pour cut-out: 654.1,1470.47 654.1,1481.3 1039.37,1481.3 1039.37,1470.47
  pour cut-out: 461.19,1360.24 461.19,1399.11 547.24,1399.11 547.24,1360.24
  pour cut-out: 487.48,1274.61 487.48,1285.43 579.45,1285.43 579.45,1274.61
  pour cut-out: 474.41,1430.4 463.58,1430.4 463.58,1522.36 474.41,1522.36
  pour cut-out: 190.94,1470.47 190.94,1481.3 302.17,1481.3 302.17,1470.47
  pour cut-out: 941.93,536.42 941.93,525.59 761.81,525.59 761.81,536.42
  pour cut-out: 792.32,331.69 792.32,342.52 967.52,342.52 967.52,331.69
  region net USB_VREG: 988.19,1407.48 1001.97,1421.26 1016.73,1421.26 1030.51,1407.48 1030.51,1371.06 1025.59,1367.13 995.08,1367.13 988.19,1374.01
  region net USB_VBUS: 1015.75,1300.2 1031.5,1284.45 1031.5,1248.03 1028.54,1245.08 995.08,1245.08 989.17,1250.98 989.17,1281.5 1007.87,1300.2
  pour cut-out: 877.95,1274.61 877.95,1285.43 990.16,1285.43 990.16,1274.61
  region net 5V: 1061.02,1274.6 1103.35,1232.28 1103.35,1195.87 1100.39,1192.91 1066.93,1192.91 1061.02,1198.82
  pour cut-out: 1068.41,1470.47 1068.41,1481.3 1112.7,1481.3 1112.7,1470.47

## Silkscreen, mask and mechanical layers (free items; w line width, h text height)
Top Overlay:
  text "EFR32xG25" at -700,1860 h126
  text "Diversity Board with Discrete Match" at 0,1860 h126
Bottom Overlay:
  lines w5.91: 43.31,543.31 43.31,561.02 50.2,567.91 ; 53.15,1730.31 53.15,1690.94 92.52,1690.94 ; 53.15,1887.8 53.15,1927.17 92.52,1927.17 ; 89.57,725.39 138.89,675.88 138.78,622.05 ; 138.82,549.25 177.1,549.18 184.06,556.1 ; 761.81,1690.94 801.18,1690.94 801.18,1730.31 ; 761.81,1927.17 801.18,1927.17 801.18,1887.8
  lines w6: 55.92,588.13 55.92,576.32 67.73,576.32 ; 55.92,603.88 55.92,615.69 67.73,615.69 ; 85.45,576.32 97.26,576.32 97.26,564.51 ; 95.29,611.75 95.29,615.69 105.13,615.69 ; 97.26,550.73 97.26,538.91 109.07,538.91 ; 118.91,538.91 130.72,538.91 130.72,550.73 ; 120.88,615.69 130.72,615.69 130.72,611.75 ; 130.72,576.32 130.72,588.13 ; 134.84,706.69 134.84,694.88 146.65,694.88 ; 134.84,722.44 134.84,734.25 146.65,734.25 ; 160.43,694.88 172.24,694.88 172.24,683.07 ; 172.24,669.29 172.24,657.48 184.06,657.48 ; 174.21,730.31 174.21,734.25 184.06,734.25 ; 199.8,657.48 211.61,657.48 211.61,669.29 ; 201.77,734.25 211.61,734.25 211.61,730.31 ; 211.61,694.88 211.61,706.69 ; 492.13,603.35 492.13,591.54 503.94,591.54 ; 492.13,619.1 492.13,630.91 503.94,630.91 ; 517.72,591.54 529.53,591.54 529.53,579.73 ; 529.53,565.95 529.53,554.14 541.34,554.14 ; 531.5,626.97 531.5,630.91 541.34,630.91 ; 557.09,554.14 568.9,554.14 568.9,565.95 ; 559.06,630.91 568.9,630.91 568.9,626.97 ; 568.9,591.54 568.9,603.35
  text "BOARD INFO" at 803.15,1940.94 h62.99
  text "PAVDD / Config." at 399.61,788.39 h62.99
  text "PCB4270Y Rev. A00" at 1182.09,775.59 h60 r270
  text "VMCU" at 229.33,744.09 h47.24
  text "VMCU Config." at 28.54,681.1 h62.99 r270
  text "PD02" at 687.01,672.24 h62.99
  text "LDO / 3V6" at 222.44,663.39 h47.24 r270
  text "WMCU_IN" at 374.02,648.62 h47.24 r36.53
  text "JOYSTICK" at 595.48,639.77 h47.24
  text "EXP9" at 579.73,554.14 h47.24 r270
  text "USB_VREG" at -0.98,313.98 h47.24 r270
BOARD OUTLINE 1:
  lines w3.94: 1211.61,0 47.24,0 cw(c47.24,47.24) 0,47.24 0,1332.76 ccw(c-47.24,1332.76) -47.24,1380 -1133.86,1380 cw(c-1133.86,1427.24) -1181.1,1427.24 -1181.1,1960.63 cw(c-1133.86,1960.63) -1133.86,2007.87 2393.7,2007.87 cw(c2393.7,1960.63) 2440.94,1960.63 2440.94,1427.24 cw(c2393.7,1427.24) 2393.7,1380 1307.08,1380 ccw(c1307.08,1332.76) 1259.84,1332.76 1259.84,47.24 cw(c1212.6,47.24) 1212.6,0